# Altium PCB BYD_Leg_OneLeg.PcbDoc
Units mil, origin at the board's own origin, x right, y up, seen from the top; angles counter-clockwise.
Board outline 11500 x 6700 mil, 4 copper layers (Top Layer, Layer 1, Layer 2, Bottom Layer), stack 40.247 mil thick; 95 components, 38 nets, 384 pads, 147 vias.
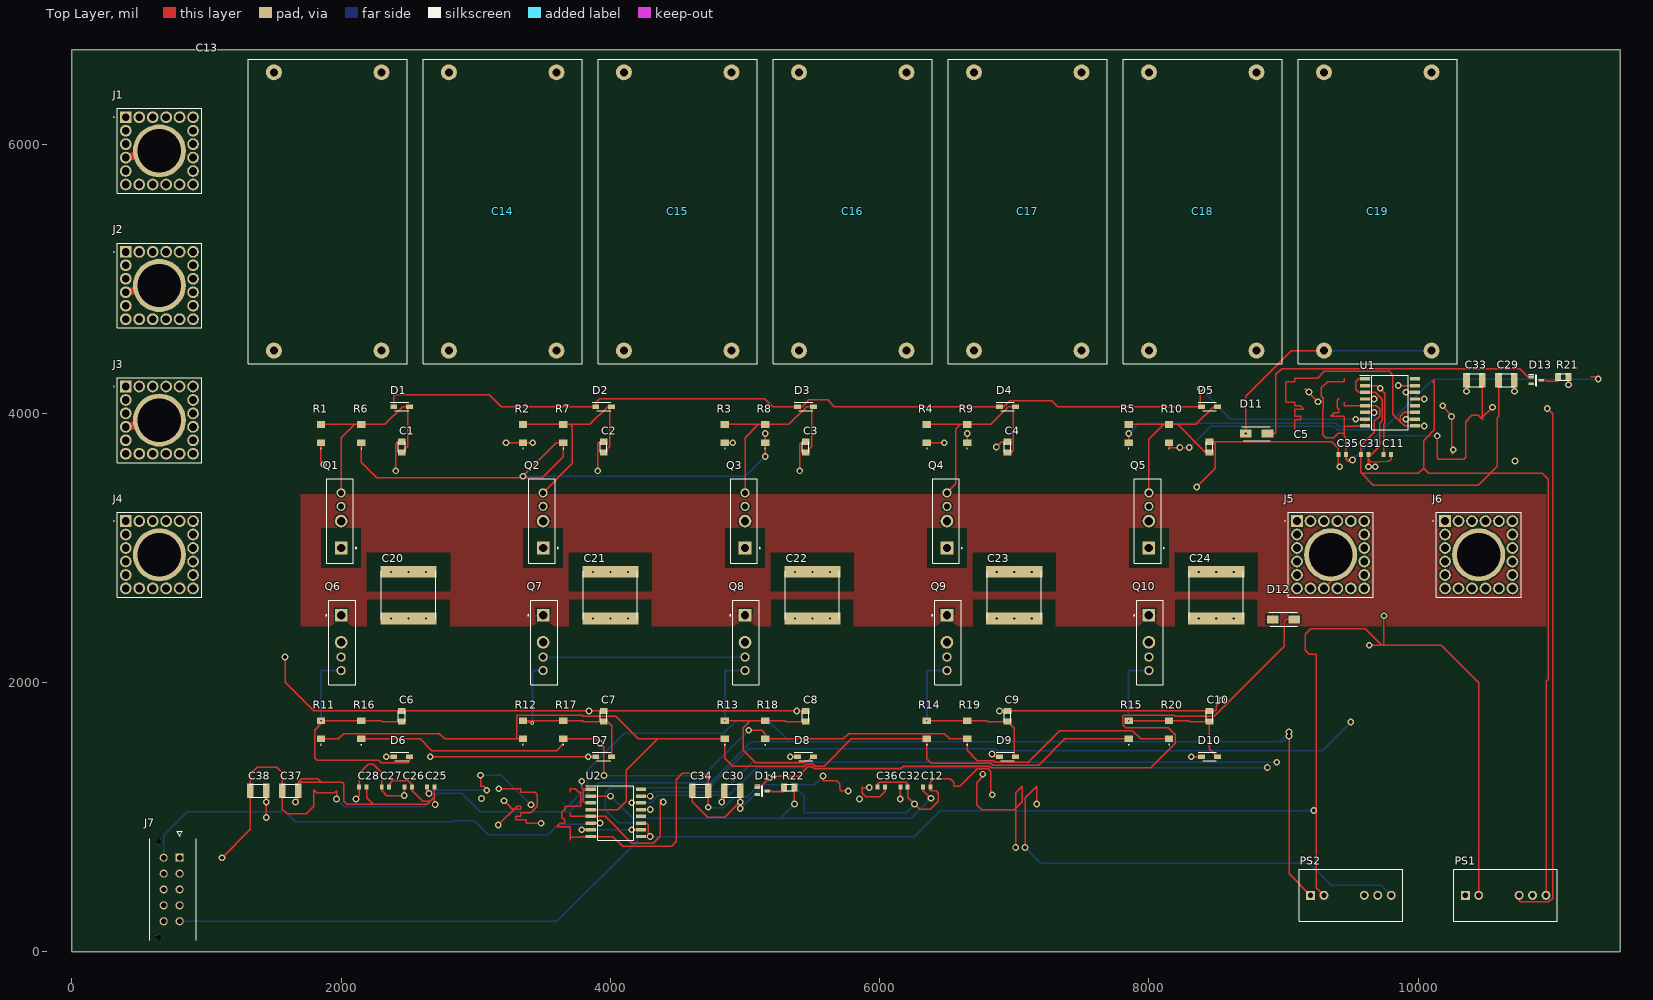
[diagram p0: Top Layer view]
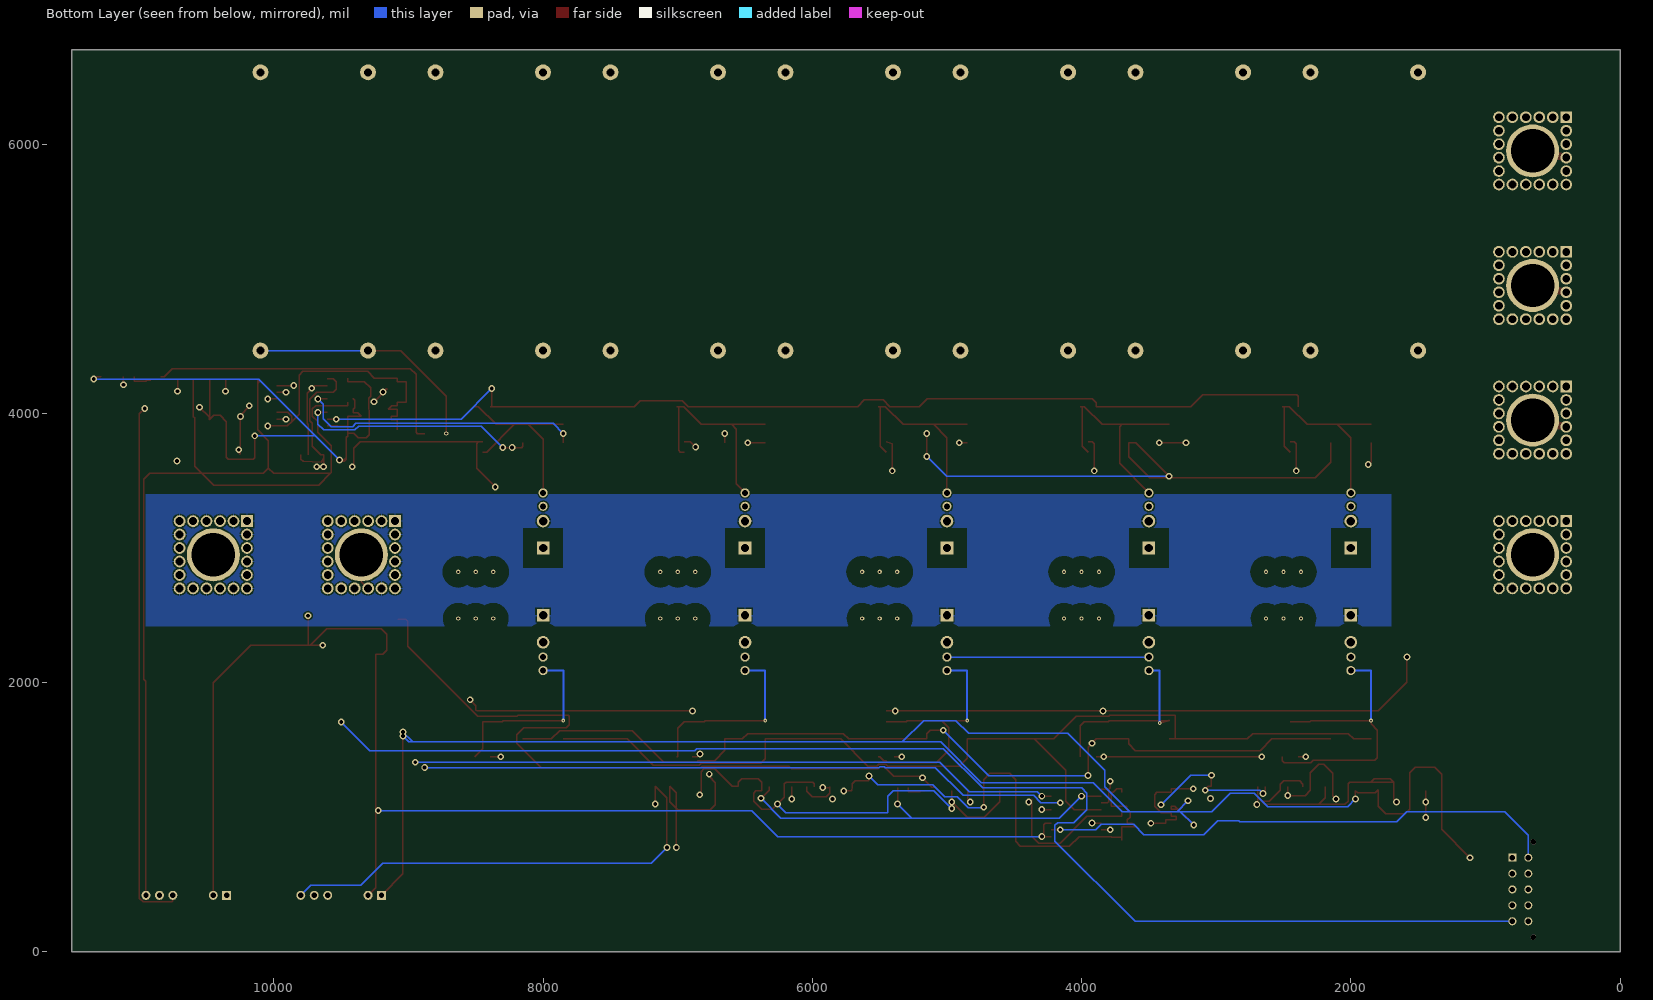
[diagram p1: Bottom Layer view, seen from below]
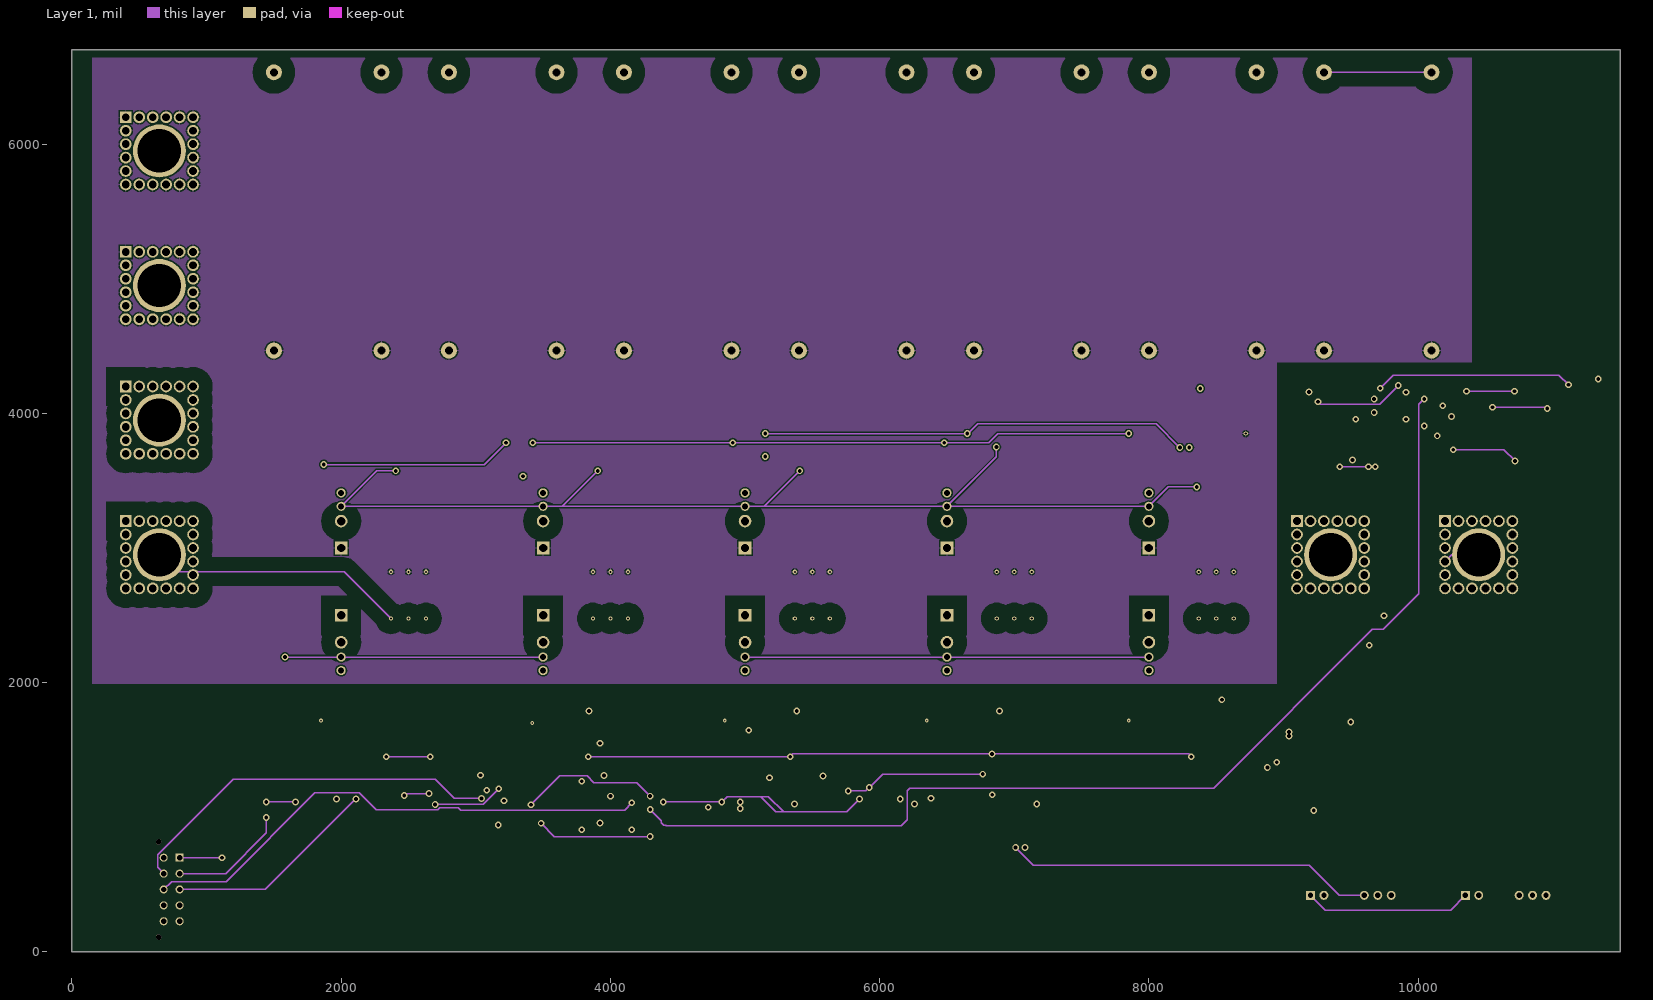
[diagram p2: Layer 1]
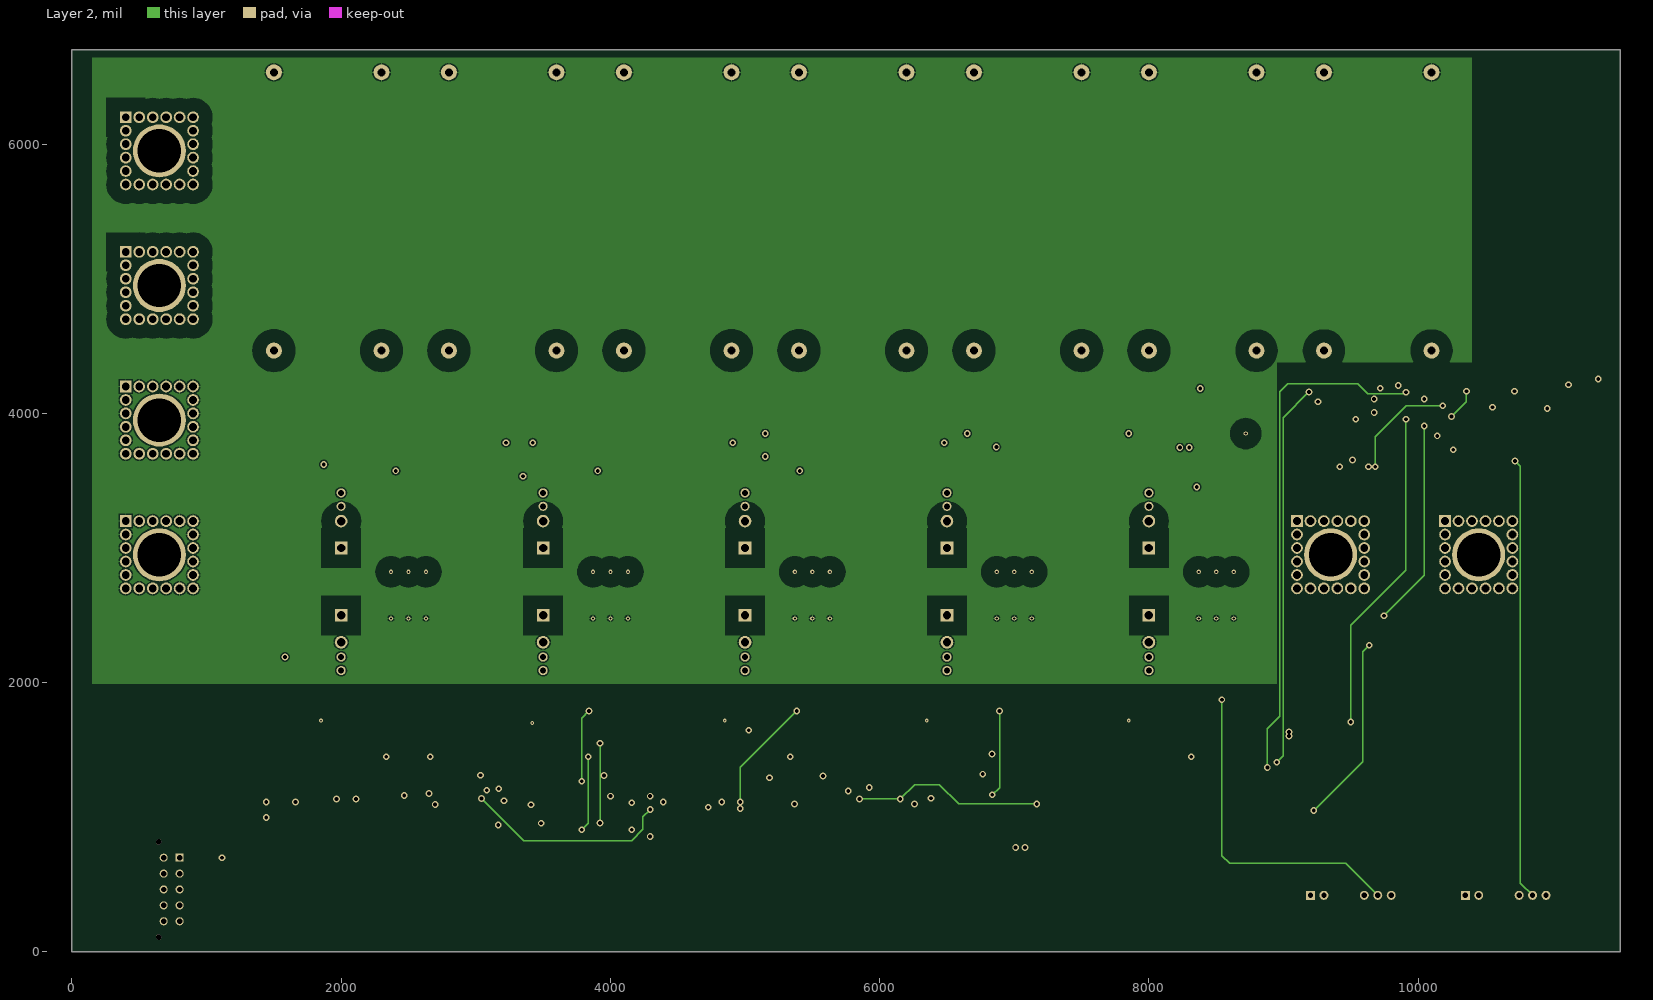
[diagram p3: Layer 2]
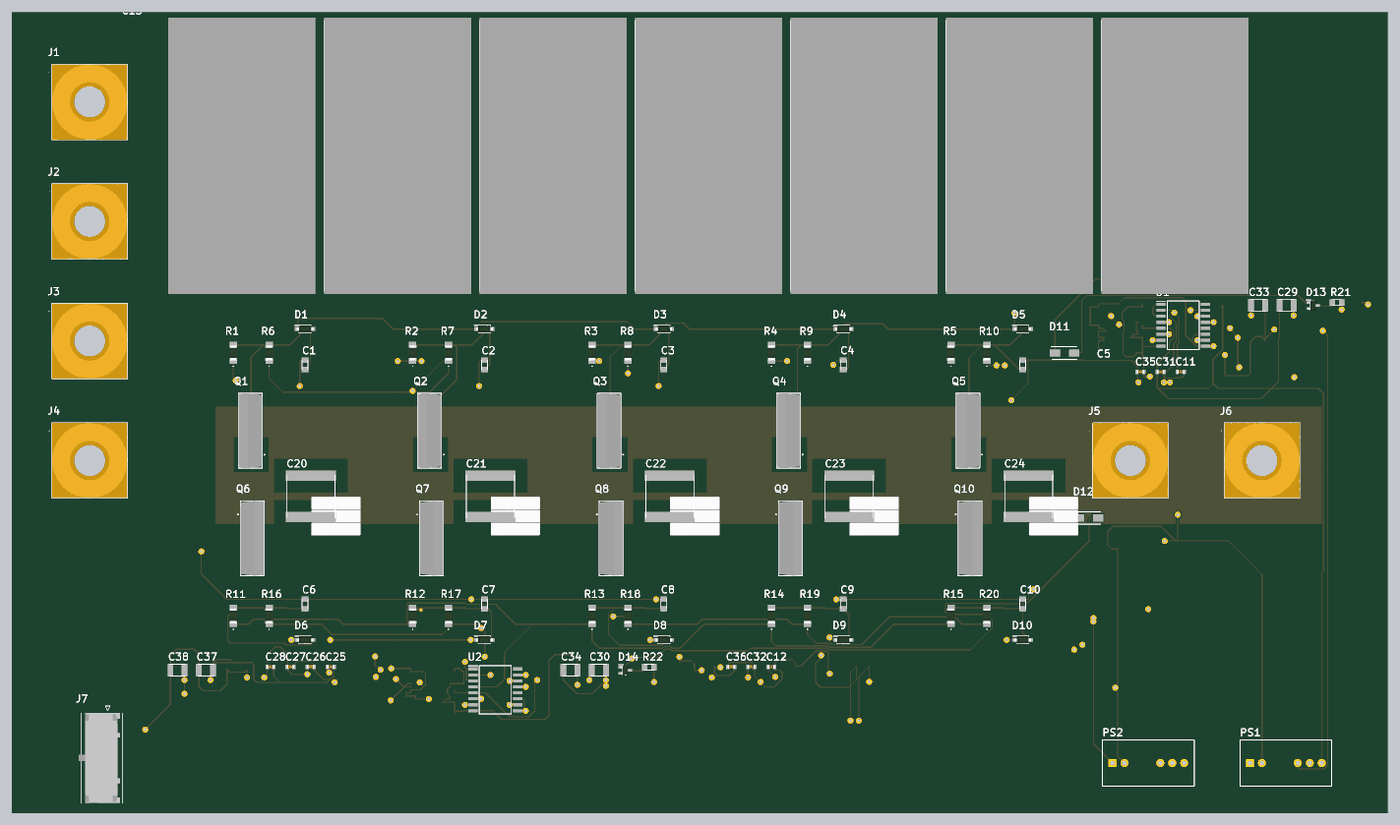
[diagram p4: 3D render of the assembled board from above, using the file's embedded part models]

## Layer stack, top to bottom
Top Solder: solder mask 0.4, Solder Resist, Dk 3.5
Top Layer: signal copper 5.5118
Dielectric 2: prepreg 2.8, PP-006, Dk 4.1
Layer 1: signal copper 5.5118
Dielectric 1: dielectric 12.6, FR-4, Dk 4.8
Layer 2: signal copper 5.5118
Dielectric 3: prepreg 2.8, PP-006, Dk 4.1
Bottom Layer: signal copper 5.5118
Bottom Solder: solder mask 0.4, Solder Resist, Dk 3.5

## Board outline
0,0 0,6700 11500,6700 11500,0

## Design rules (kind name [scope] priority, off if disabled: settings)
Clearance FinePitch_IC [InComponent('U3') or InComponent('U4') or InComponent('U5') vs InComponent('U3') or InComponent('U4') or InComponent('U5')] p1: gap=7 ignorepadtopadclearanceinfootprint=FALSE
Clearance HV_Clearance_1 [InNet('DCP') or InNet('DCN') or InNet('PH') vs InNet('DCP') or InNet('DCN') or InNet('PH')] p2: gap=100 ignorepadtopadclearanceinfootprint=FALSE // IPC-2221B B2/B4 spacing for 400 V bus, 525 V peak
Clearance HV_Clearance [InNet('DCP') or InNet('DCN') or InNet('PH') vs InNet('DCP') or InNet('DCN') or InNet('PH')] p3: gap=100 ignorepadtopadclearanceinfootprint=FALSE // IPC-2221B B2/B4 spacing for 400 V bus, 525 V peak
Clearance [All] p4: gap=10 ignorepadtopadclearanceinfootprint=FALSE
Height [All] p1: minheight=0 maxheight=10000 prefheight=500
PolygonConnect [All] p1: connectstyle=Relief reliefconductorwidth=10 reliefentries=4 polygonreliefangle="90 Angle" airgapwidth=10
RoutingVias [All] p1: holewidth=28 width=50 viastyle="Through Hole" minholewidth=28 minwidth=50 maxholewidth=28 maxwidth=50
SolderMaskExpansion [All] p1: expansion=0 istentingtop=FALSE
Width [All] p1: maxlimit=100 minlimit=10 preferedwidth=10
29 further rules are at their usual default settings.

## Components (designator, comment, footprint, x,y, rotation, side; value= is the part's Value field where it differs from the comment)
C1 "C0805C222J5GACAUTO" CAPC2012_0805 2450,3750 r90 top
C2 "C0805C222J5GACAUTO" CAPC2012_0805 3950,3750 r90 top
C3 "C0805C222J5GACAUTO" CAPC2012_0805 5450,3750 r90 top
C4 "C0805C222J5GACAUTO" CAPC2012_0805 6950,3750 r90 top
C5 "C0805C222J5GACAUTO" CAPC2012_0805 8450,3750 r90 top
C6 "C0805C222J5GACAUTO" CAPC2012_0805 2450,1750 r90 top
C7 "C0805C222J5GACAUTO" CAPC2012_0805 3950,1750 r90 top
C8 "C0805C222J5GACAUTO" CAPC2012_0805 5450,1750 r90 top
C9 "C0805C222J5GACAUTO" CAPC2012_0805 6950,1750 r90 top
C10 "C0805C222J5GACAUTO" CAPC2012_0805 8450,1750 r90 top
C11 "GCM1885C1H220JA16D" CAPC1608X90N 9771,3693 r0 top
C12 "GCM1885C1H220JA16D" CAPC1608X90N 6349,1225 r0 top
C13 "C4AKJBW5450A3MJ" C4AK_52P5 1900,5500 r90 top
C14 "C4AKJBW5450A3MJ" C4AK_52P5 3200,5500 r90 top
C15 "C4AKJBW5450A3MJ" C4AK_52P5 4500,5500 r90 top
C16 "C4AKJBW5450A3MJ" C4AK_52P5 5800,5500 r90 top
C17 "C4AKJBW5450A3MJ" C4AK_52P5 7100,5500 r90 top
C18 "C4AKJBW5450A3MJ" C4AK_52P5 8400,5500 r90 top
C19 "C4AKJBW5450A3MJ" C4AK_52P5 9700,5500 r90 top
C20 "CKC33C454KWGLC7805" KCLINK_3640 2500,2650 r270 top
C21 "CKC33C454KWGLC7805" KCLINK_3640 4000,2650 r270 top
C22 "CKC33C454KWGLC7805" KCLINK_3640 5500,2650 r270 top
C23 "CKC33C454KWGLC7805" KCLINK_3640 7000,2650 r270 top
C24 "CKC33C454KWGLC7805" KCLINK_3640 8500,2650 r270 top
C25 "1 uF" CAPC1608X90N 2665,1225 r0 top
C26 "1 uF" CAPC1608X90N 2497,1225 r0 top
C27 "100 nF" CAPC1608X90N 2329,1225 r0 top
C28 "100 nF" CAPC1608X90N 2161,1225 r0 top
C29 "10 uF" CAPC3225_1210 10656,4247 r0 top
C30 "10 uF" CAPC3225_1210 4906,1197 r0 top
C31 "100 nF" CAPC1608X90N 9603,3693 r0 top
C32 "100 nF" CAPC1608X90N 6181,1225 r0 top
C33 "10 uF" CAPC3225_1210 10418,4247 r0 top
C34 "10 uF" CAPC3225_1210 4668,1197 r0 top
C35 "100 nF" CAPC1608X90N 9435,3693 r0 top
C36 "100 nF" CAPC1608X90N 6013,1225 r0 top
C37 "10 uF" CAPC3225_1210 1622,1197 r0 top
C38 "10 uF" CAPC3225_1210 1384,1197 r0 top
D1 "PMEG4010CEH-Q" SOD3516X120N 2450,4050 r0 top
D2 "PMEG4010CEH-Q" SOD3516X120N 3950,4050 r0 top
D3 "PMEG4010CEH-Q" SOD3516X120N 5450,4050 r0 top
D4 "PMEG4010CEH-Q" SOD3516X120N 6950,4050 r0 top
D5 "PMEG4010CEH-Q" SOD3516X120N 8450,4050 r0 top
D6 "PMEG4010CEH-Q" SOD3516X120N 2450,1450 r0 top
D7 "PMEG4010CEH-Q" SOD3516X120N 3950,1450 r0 top
D8 "PMEG4010CEH-Q" SOD3516X120N 5450,1450 r0 top
D9 "PMEG4010CEH-Q" SOD3516X120N 6950,1450 r0 top
D10 "PMEG4010CEH-Q" SOD3516X120N 8450,1450 r0 top
D11 "US1MHE3" DIOM5127X229N 8800,3850 r0 top
D12 "US1MHE3" DIOM5127X229N 9000,2470 r0 top
D13 "BZX84W-C3V3" SOT65P210X110-3N 10878,4246 r0 top
D14 "BZX84W-C3V3" SOT65P210X110-3N 5128,1196 r0 top
J1 "7461090" 7461090 400,6200 r0 top
J2 "7461090" 7461090 400,5200 r0 top
J3 "7461090" 7461090 400,4200 r0 top
J4 "7461090" 7461090 400,3200 r0 top
J5 "7461090" 7461090 9100,3200 r0 top
J6 "7461090" 7461090 10200,3200 r0 top
J7 "43045-1012" 43045-10YY_121314 800,700 r90 top
PS1 "MGJ2D121805BSC" SIP7_MGJ2 10650,420 r0 top
PS2 "MGJ2D121805BSC" SIP7_MGJ2 9500,420 r0 top
Q1 "E4MS008075K1" E4M0060075K1 2000,3000 r90 top
Q2 "E4MS008075K1" E4M0060075K1 3500,3000 r90 top
Q3 "E4MS008075K1" E4M0060075K1 5000,3000 r90 top
Q4 "E4MS008075K1" E4M0060075K1 6500,3000 r90 top
Q5 "E4MS008075K1" E4M0060075K1 8000,3000 r90 top
Q6 "E4MS008075K1" E4M0060075K1 2000,2500 r270 top
Q7 "E4MS008075K1" E4M0060075K1 3500,2500 r270 top
Q8 "E4MS008075K1" E4M0060075K1 5000,2500 r270 top
Q9 "E4MS008075K1" E4M0060075K1 6500,2500 r270 top
Q10 "E4MS008075K1" E4M0060075K1 8000,2500 r270 top
R1 "ERJ-P08F10R0V" ERJP08_(1206) 1850,3850 r90 top
R2 "ERJ-P08F10R0V" ERJP08_(1206) 3350,3850 r90 top
R3 "ERJ-P08F10R0V" ERJP08_(1206) 4850,3850 r90 top
R4 "ERJ-P08F10R0V" ERJP08_(1206) 6350,3850 r90 top
R5 "ERJ-P08F10R0V" ERJP08_(1206) 7850,3850 r90 top
R6 "ERJ-P08F15R0V" ERJP08_(1206) 2150,3850 r90 top
R7 "ERJ-P08F15R0V" ERJP08_(1206) 3650,3850 r90 top
R8 "ERJ-P08F15R0V" ERJP08_(1206) 5150,3850 r90 top
R9 "ERJ-P08F15R0V" ERJP08_(1206) 6650,3850 r90 top
R10 "ERJ-P08F15R0V" ERJP08_(1206) 8150,3850 r90 top
R11 "ERJ-P08F10R0V" ERJP08_(1206) 1850,1650 r90 top
R12 "ERJ-P08F10R0V" ERJP08_(1206) 3350,1650 r90 top
R13 "ERJ-P08F10R0V" ERJP08_(1206) 4850,1650 r90 top
R14 "ERJ-P08F10R0V" ERJP08_(1206) 6350,1650 r90 top
R15 "ERJ-P08F10R0V" ERJP08_(1206) 7850,1650 r90 top
R16 "ERJ-P08F15R0V" ERJP08_(1206) 2150,1650 r90 top
R17 "ERJ-P08F15R0V" ERJP08_(1206) 3650,1650 r90 top
R18 "ERJ-P08F15R0V" ERJP08_(1206) 5150,1650 r90 top
R19 "ERJ-P08F15R0V" ERJP08_(1206) 6650,1650 r90 top
R20 "ERJ-P08F15R0V" ERJP08_(1206) 8150,1650 r90 top
R21 "1 kOhm" RESC2012_0805 11078,4271 r0 top
R22 "1 kOhm" RESC2012_0805 5328,1221 r0 top
U1 "UCC21750QDWRQ1" SOIC127P1030X265-16N 9791,4082 r0 top
U2 "UCC21750QDWRQ1" SOIC127P1030X265-16N 4041,1032 r0 top

## Footprints (in the part's own frame and the unit in brackets; to place one, negate y for a bottom-side part, rotate by r counter-clockwise, add the part's x,y. Pads: shape width x height; smd on the part's side, far side on the other; paste and mask are expansions set on the pad)
43045-10YY_121314 [mm]
  rect 1.52x1.52 hole 1.02: 1(0,0)
  round 1.52 hole 1.02: 2(-3,0) 3(-6,0) 4(-9,0) 5(-12,0) 6(0,3) 7(-3,3) 8(-6,3) 9(-9,3) 10(-12,3)
  round 1.02 hole 1.02 unplated: 11(3,3.94) 12(-15,3.94)
  silkscreen extent -15.57,-3.17 5,5.6, body extent -15.63,-2.59 3.52,6.18, height 9.75
7461090 [mm]
  rect 2.213x2.213 hole 1.475: 1(0,0)
  round 2.213 hole 1.475: 2(0,-2.54) 3(0,-5.08) 4(0,-7.62) 5(0,-10.16) 6(0,-12.7) 7(2.54,-12.7) 8(5.08,-12.7) 9(7.62,-12.7) 10(10.16,-12.7) 11(12.7,-12.7) 12(12.7,-10.16) 13(12.7,-7.62) 14(12.7,-5.08) 15(12.7,-2.54) 16(12.7,0) 17(10.16,0) 18(7.62,0) 19(5.08,0) 20(2.54,0)
  round 10 hole 8.2: 22(6.35,-6.35)
  silkscreen extent -2.3,-14.35 14.35,1.65, body extent -1.65,-14.35 14.35,1.65, height 13.5
C4AK_52P5 [mil] "KEMET C4AK box film capacitor, 4 leads 52.5 x 20.3 mm"
  round 118 hole 59: 1(-1033.5,-399.6) 1(-1033.5,399.6) 2(1033.5,-399.6) 2(1033.5,399.6)
  silkscreen extent -1132,-591 1132,591, body extent -1156,-637 1156,592, height 1819
CAPC1608X90N [mm]
  rect 0.75x0.94 smd: 1(-0.7,0) 2(0.7,0)
  body extent -0.8,-0.4 0.8,0.4, height 0.9
CAPC2012_0805 [mil] "Chip capacitor 0805"
  rect 45.3x57.1 smd: 1(-39.4,0) 2(39.4,0)
  silkscreen extent -39,-25 39,25
CAPC3225_1210 [mil] "Chip capacitor 1210"
  rect 49.2x106.3 smd: 1(-59.1,0) 2(59.1,0)
  silkscreen extent -63,-49 63,49
DIOM5127X229N [mm]
  rect 2.2x1.55 smd: 1(-2.05,0) 2(2.05,0)
  silkscreen extent -2.82,-1.33 2.55,1.33, body extent -0.23,4.13 -0.23,4.13, height 3.6
E4M0060075K1 [mm]
  rect 2.383x2.383 hole 1.589: 1(0,0)
  round 2.383 hole 1.589: 2(5.08,0)
  round 1.725 hole 1.15: 3(7.87,0) 4(10.41,0)
  silkscreen extent -2.89,-2.9 13.05,2.73, body extent -2.89,-2.3 13.05,2.72, height 25.86
ERJP08_(1206) [mm]
  rect 1.25x1.55 smd: 1(-1.725,0) 2(1.725,0)
  silkscreen extent -2.87,-0.05 -2.78,0.05, body extent -1.6,-0.8 1.6,0.8, height 0.6
KCLINK_3640 [mil] "KEMET KC-LINK 3640 stacked C0G"
  rect 86.6x417.3 smd: 1(-173.2,0) 2(173.2,0)
  silkscreen extent -179,-201 179,201, body extent 0,0 327,417
RESC2012_0805 [mil] "Chip 0805 (2012 metric)"
  rect 45.3x57.1 smd: 1(-39.4,0) 2(39.4,0)
  silkscreen extent -39,-25 39,25
SIP7_MGJ2 [mil] "Murata MGJ2 SIP-7 (pins 1,2,5,6,7; 2.54 mm pitch)"
  rect 67x67 hole 39.4: 1(-300,0)
  round 67 hole 39.4: 2(-200,0) 5(100,0) 6(200,0) 7(300,0)
  silkscreen extent -384,-193 384,193
SOD3516X120N [mm]
  rect 1.3x0.8 smd: 1(-1.5,0) 2(1.5,0)
  silkscreen extent -2.15,-0.8 1.3,0.8, body extent -1.75,-0.8 1.75,0.8, height 1.1
SOIC127P1030X265-16N [mm]
  rect 1.95x0.65 smd: 1(-4.725,4.445) 2(-4.725,3.175) 3(-4.725,1.905) 4(-4.725,0.635) 5(-4.725,-0.635) 6(-4.725,-1.905) 7(-4.725,-3.175) 8(-4.725,-4.445) 9(4.725,-4.445) 10(4.725,-3.175) 11(4.725,-1.905) 12(4.725,-0.635) 13(4.725,0.635) 14(4.725,1.905) 15(4.725,3.175) 16(4.725,4.445)
  silkscreen extent -5.7,-5.15 3.4,5.15, body extent 0,0 0,0
SOT65P210X110-3N [mm]
  rect 1x0.55 smd: 1(-0.95,0.65) 2(-0.95,-0.65) 3(0.95,0)
  silkscreen extent -1.45,-1 0.1,1.18, body extent -1.05,-1.05 1.05,1.05, height 0.95

## Part data
C1 C2 C3 C4 C5 C6 C7 C8 C9 C10: library part CAP_NP, "2.2 nF 50 V C0G 0805 (external Cgs)"
C11 C12: "22 pF 50 V C0G 0603 DESAT blanking", Manufacturer_Name="Murata Electronics", Mouser Part Number=81-GCM1885C1H220J16D, Arrow Part Number=GCM1885C1H220JA16D, Arrow Price/Stock=https://www.arrow.com/en/products/gcm1885c1h220ja16d/murata-manufacturing?utm_currency=USD&region=europe, Datasheet Link=https://search.murata.co.jp/Ceramy/image/img/A01X/G101/ENG/GCM1885C1H220JA16-01A.pdf, Height=0.9mm, Manufacturer_Part_Number=GCM1885C1H220JA16D, Mouser Price/Stock=https://www.mouser.com/Search/Refine.aspx?Keyword=81-GCM1885C1H220J16D
C13 C14 C15 C16 C17 C18 C19: library part CAP_NP, "45 uF 700 V DC-link film (KEMET C4AK)"
C20 C21 C22 C23 C24: library part CAP_NP, "450 nF 650 V C0G KC-LINK, one per device pair"
C25 C26: library part CAP_NP, "1 uF 16 V X7R 0603, driver VCC"
C27 C28: library part CAP_NP, "100 nF 50 V X7R 0603, driver VCC"
C29 C30: library part CAP_NP, "10 uF 50 V X7R 1210, driver VDD-COM"
C31 C32: library part CAP_NP, "100 nF 50 V X7R 0603, driver VDD-COM"
C33 C34: library part CAP_NP, "10 uF 50 V X7R 1210, driver COM-VEE"
C35 C36: library part CAP_NP, "100 nF 50 V X7R 0603, driver COM-VEE"
C37 C38: library part CAP_NP, "10 uF 50 V X7R 1210, bias VIN"
D1 D2 D3 D4 D5 D6 D7 D8 D9 D10: library part PMEG4010CEH, "40 V 1 A Schottky gate clamp", Manufacturer_Name=Nexperia, Mouser Part Number=N/A, Datasheet Link=https://datasheet.datasheetarchive.com/originals/distributors/SFDatasheet-4/sf-00082344.pdf, Height=1.2mm, Manufacturer_Part_Number=PMEG4010CEH, Mouser Price/Stock=https://www.mouser.co.uk/ProductDetail/Nexperia/PMEG4010CEH?qs=vHuUswq2%252BszYBzs3vH3ikw%3D%3D
D11 D12: library part US1MHE3_61T, "1000 V 1 A ultrafast DESAT diode", Manufacturer_Name=Vishay, Manufacturer_Part_Number=US1MHE3/61T, Mouser Part Number=625-US1MHE3, Datasheet Link=https://www.vishay.com/docs/88768/us1_test_dcicons.pdf, Height=2.29mm, Mouser Price/Stock=https://www.mouser.co.uk/ProductDetail/Vishay-Semiconductors/US1MHE3-61T?qs=D6r9GjgEnNNyhtP47Emw%252Bg%3D%3D
D13 D14: library part BZX84W-C3V3F, "3.3 V Zener, DESAT threshold offset", Manufacturer_Name=Nexperia, Mouser Part Number=771-BZX84W-C3V3F, Arrow Part Number=BZX84W-C3V3F, Arrow Price/Stock=https://www.arrow.com/en/products/bzx84w-c3v3f/nexperia.html?utm_currency=USD&region=europe, Datasheet Link=https://assets.nexperia.com/documents/data-sheet/BZX84W_SER.pdf, Height=1.1mm, Manufacturer_Part_Number=BZX84W-C3V3F, Mouser Price/Stock=https://www.mouser.co.uk/ProductDetail/Nexperia/BZX84W-C3V3F?qs=MLItCLRbWsyTlmZP9y0kXg%3D%3D
J1 J2 J3 J4 J5 J6: "REDCUBE M8 press-fit power terminal 350 A", Manufacturer_Name="Wurth Elektronik", Mouser Part Number=710-7461090, Datasheet Link=https://www.we-online.com/catalog/datasheet/7461090.pdf, Height=13.5mm, Manufacturer_Part_Number=7461090, Mouser Price/Stock=https://www.mouser.co.uk/ProductDetail/Wurth-Elektronik/7461090?qs=lykWx4dhCCGdDXRKZo1kEg%3D%3D
J7: "Control connector 2x5 Micro-Fit 3.0", Manufacturer_Name=Molex, Mouser Part Number=538-43045-1012, Datasheet Link=https://www.molex.com/pdm_docs/sd/430450612_sd.pdf, Height=9.91mm, Manufacturer_Part_Number=43045-1012, Mouser Price/Stock=https://www.mouser.co.uk/ProductDetail/Molex/43045-1012?qs=KC2ywxza1koTZPAgAiHw3w%3D%3D
PS1 PS2: "Isolated DC/DC 12 V to +18 V / -5 V, 2 W, 5.4 kV (Murata MGJ2B)"
Q1 Q2 Q3 Q4 Q5 Q6 Q7 Q8 Q9 Q10: library part E4M0015075K1, "SiC MOSFET 750 V 8 mOhm TO-247-4 (Wolfspeed)", Manufacturer_Name=Wolfspeed, Mouser Part Number=941-E4M0015075K1, Arrow Part Number=E4M0015075K1, Arrow Price/Stock=https://www.arrow.com/en/products/e4m0015075k1/wolfspeed.html?utm_currency=USD&region=nac, Datasheet Link=https://assets.wolfspeed.com/uploads/2024/04/Wolfspeed_E4M0015075K1_data_sheet.pdf, Height=21.14mm, Manufacturer_Part_Number=E4M0015075K1, Mouser Price/Stock=https://www.mouser.co.uk/ProductDetail/Wolfspeed/E4M0015075K1?qs=dbcCsuKDzFXJMp4AtpeCVw%3D%3D
R1 R2 R3 R4 R5 R11 R12 R13 R14 R15: "10 Ohm 1% 1206 0.66 W anti-surge (RG,on)", Manufacturer_Name=Panasonic, Mouser Part Number=667-ERJ-P08F10R0V, Arrow Part Number=ERJ-P08F10R0V, Arrow Price/Stock=https://www.arrow.com/en/products/erj-p08f10r0v/panasonic?region=nac, Datasheet Link=http://industrial.panasonic.com/cdbs/www-data/pdf/RDO0000/AOA0000C331.pdf, Height=0.7mm, Manufacturer_Part_Number=ERJ-P08F10R0V, Mouser Price/Stock=https://www.mouser.co.uk/ProductDetail/Panasonic/ERJ-P08F10R0V?qs=iIVTEDlrHA2fc4Vdv4Btrw%3D%3D
R6 R7 R8 R9 R10 R16 R17 R18 R19 R20: "15 Ohm 1% 1206 0.66 W anti-surge (RG,off)", Manufacturer_Name=Panasonic, Mouser Part Number=667-ERJ-P08F15R0V, Arrow Part Number=ERJ-P08F15R0V, Arrow Price/Stock=https://www.arrow.com/en/products/erjp08f15r0v/panasonic?utm_currency=USD&region=nac, Datasheet Link=http://industrial.panasonic.com/cdbs/www-data/pdf/RDO0000/AOA0000C331.pdf, Height=0.7mm, Manufacturer_Part_Number=ERJ-P08F15R0V, Mouser Price/Stock=https://www.mouser.co.uk/ProductDetail/Panasonic/ERJ-P08F15R0V?qs=iIVTEDlrHA16GO8SZGWd2Q%3D%3D
R21 R22: library part RES, "1 kOhm 1% 0805 DESAT series resistor"
U1 U2: "Isolated SiC gate driver, 10 A, DESAT, Miller clamp", Manufacturer_Name="Texas Instruments", Mouser Part Number=595-UCC21750QDWRQ1, Arrow Part Number=UCC21750QDWRQ1, Arrow Price/Stock=https://www.arrow.com/en/products/ucc21750qdwrq1/texas-instruments.html?utm_currency=USD&region=nac, Datasheet Link=https://www.ti.com/lit/gpn/UCC21750-Q1, Height=2.65mm, Manufacturer_Part_Number=UCC21750QDWRQ1, Mouser Price/Stock=https://www.mouser.co.uk/ProductDetail/Texas-Instruments/UCC21750QDWRQ1?qs=BJlw7L4Cy7%2FADnnEzoLd5w%3D%3D

## Via types
v1: diameter 50, hole 28, Top Layer to Bottom Layer, 111 vias
v2: diameter 32, hole 16, Top Layer to Bottom Layer, 31 vias
v3: diameter 28, hole 12, Top Layer to Bottom Layer, 5 vias

## Nets (pads, with @x,y where several pads share a name; then routed paths per layer and width w, separated by ;. In a path a pad name is that pad's centre, name@x,y a point inside that pad or via, vN(x,y) a via of type N, cw(c..) or ccw(c..) an arc to the next point about the centre after c; other vN are vias at no path point)
+5V: C25.1 C26.1 C27.1 C28.1 J7.3 U1.15 U2.15 | length 13440.3
  Top Layer w10: v1(2109.41,1136) 2133.44,1160.03 C28.1 2133.44,1325.44 2200,1392 2240,1392 2301.44,1330.56 C27.1 2301.44,1200 2340.22,1161.22 2468.32,1161.22 2468.34,1162.36 C26.1 v1(2469.44,1162.34) ; C25.1 2637.44,1190.34 v1(2652,1175.78) ; v1(3035.5,1312) 3035.5,1230 3060,1230 3082,1208 v1(3082,1200) ; v1(3409.35,1093.6) v1@3409.35,1113.6 ; U2.15 v1(4295,1157) ; v1(9189,4159) 9163.3,4184.7 9158.3,4184.7 v1(9256,4087) ; v1(9853,4207) U1.15
  Layer 1 w10: J7.3 1437.19,463.78 v1(2109.41,1136) ; v1(2469.44,1162.34) 2482.88,1175.78 v1(2652,1175.78) ; v1(3409.35,1093.6) 3622.75,1307 3826.59,1307 3876.59,1257 4195,1257 v1(4295,1157) ; v1(9256,4087) 9276,4067 9713,4067 v1(9853,4207)
  Layer 2 w10: v1(8949,1409) 8998,1458 8998,3968 v1(9189,4159)
  Bottom Layer w10: v1(2652,1175.78) 2676.22,1200 v1(3082,1200) ; v1(3035.5,1312) 3190.95,1312 v1(3409.35,1093.6) ; v1(4295,1157) 4328,1190 4833,1190 5052,1409 v1(8949,1409)
+12V: C37.1 C38.1 J7.1 PS1.1 PS2.1 | length 19068.3
  Top Layer w10: v1(1114.9,700) 1324.9,910 C38.1 1324.9,1320 1376.9,1372 1520,1372 1562.9,1329.1 C37.1 1562.9,1060 1597.9,1025 1742.44,1025 1797.44,1080 1797.44,1204 1820,1181.44 1950,1181.44 1965.44,1196.88 v1(1965.44,1136) ; v1(3167,943) 3307.6,1083.6 3334,1083.6 ; v1(3210,1122) 3274,1058 3334,1058 ; 3334.9,1058 3334,1058 ; 3334.9,1083.6 3334,1083.6 ; v1(9041,1633) v1(9041,1603) 9041,579 PS2.1 ; 3334,1058 3334,1083.6
  Layer 1 w10: J7.1 v1(1114.9,700) ; PS2.1 9309,311 10241,311 PS1.1
  Layer 2 w10: v1(9041,1603) v1(9041,1633)
  Bottom Layer w10: v1(1965.44,1136) 2023.44,1078 2616,1078 2718,1180 2894,1180 3032,1042 3290,1042 ; v1(3167,943) 3266,1042 3290,1042 ; v1(3210,1122) 3290,1042 ; v1(9041,1603) 8998,1560 8968,1560 ; v1(9041,1633) 8968,1560 ; 3290,1042 3697,1042 3912,1257 4745,1257 5048,1560 8968,1560 ; 3290,1042 3642,1042 3827,1227 3827,1350 4102,1625 4840,1625 4933,1718 5174,1718 5332,1560 8968,1560
CLMPI_H: D1.1 D2.1 D3.1 D4.1 D5.1 U1.7 | length 7722.2
  Top Layer w10: D1.1 2390,4050 2390,4129 2400,4139 3099,4139 3188,4050 D2.1@3890,4050 ; D2.1 D2.1@3890,4050 ; v1(8381,4185) D5.1@8381,4050 ; D5.1 D5.1@8381,4050 ; v1(9537,3957) U1.7 ; D2.1@3890,4050 3890,4080 3920,4110 5147,4110 5207,4050 D3.1 5424,4050 5474,4100 5614,4100 5664,4050 D4.1 6920,4050 6965,4095 7279,4095 7324,4050 D5.1@8381,4050
  Bottom Layer w10: v1(8381,4185) 8609,3957 v1(9537,3957)
CLMPI_L: D6.1 D7.1 D8.1 D9.1 D10.1 U2.7 | length 6934.5
  Top Layer w10: v1(2335,1450) D6.1 ; v1(2661,1450) v1(3835.35,1450) D7.1 ; v1(3787,907) U2.7 ; v1(5335.35,1450) D8.1 ; v1(6835.35,1470) 6855.35,1450 D9.1 ; v1(8315,1450) D10.1
  Layer 1 w10: v1(2335,1450) v1(2661,1450) ; v1(3835.35,1450) v1(5335.35,1450) 5355.35,1470 v1(6835.35,1470) 8295,1470 v1(8315,1450)
  Layer 2 w10: v1(3787,907) 3835.35,955.35 v1(3835.35,1450)
DCN: C13.2 C14.2 C15.2 C16.2 C17.2 C18.2 C19.2 C20.2 C21.2 C22.2 C23.2 C24.2 J3.1 J3.2 J3.3 J3.4 J3.5 J3.6 J3.7 J3.8 J3.9 J3.10 J3.11 J3.12 J3.13 J3.14 J3.15 J3.16 J3.17 J3.18 J3.19 J3.20 J3.22 J4.1 J4.2 J4.3 J4.4 J4.5 J4.6 J4.7 J4.8 J4.9 J4.10 J4.11 J4.12 J4.13 J4.14 J4.15 J4.16 J4.17 J4.18 J4.19 J4.20 J4.22 Q6.2 Q7.2 Q8.2 Q9.2 Q10.2 | length 3043.7
  Top Layer w60: J3.4 J3.22
  Layer 1 w10: J4.22 650,2825 2022,2825 v2(2370,2477) ; C19.2@9300.4,6533.5 9300.9,6533 10099.1,6533 C19.2@10099.6,6533.5
  other v2: 2500,2477 2630,2477 3870,2477 4000,2477 4130,2477 5370,2477 5500,2477 5630,2477 6870,2477 7000,2477 7130,2477 8370,2477 8500,2477 8630,2477
DCP: C13.1 C14.1 C15.1 C16.1 C17.1 C18.1 C19.1 C20.1 C21.1 C22.1 C23.1 C24.1 D11.1 J1.1 J1.2 J1.3 J1.4 J1.5 J1.6 J1.7 J1.8 J1.9 J1.10 J1.11 J1.12 J1.13 J1.14 J1.15 J1.16 J1.17 J1.18 J1.19 J1.20 J1.22 J2.1 J2.2 J2.3 J2.4 J2.5 J2.6 J2.7 J2.8 J2.9 J2.10 J2.11 J2.12 J2.13 J2.14 J2.15 J2.16 J2.17 J2.18 J2.19 J2.20 J2.22 Q1.1 Q2.1 Q3.1 Q4.1 Q5.1 | length 2308.4
  Top Layer w10: D11.1 v2(8719,3850) 8719,4127 9058.5,4466.5 C19.1@9300.4,4466.5
  Top Layer w60: J2.4 J2.22 ; J1.4 J1.22
  Bottom Layer w10: C19.1@9300.4,4466.5 C19.1@10099.6,4466.5
  other v2: 2370,2823 2500,2823 2630,2823 3870,2823 4000,2823 4130,2823 5370,2823 5500,2823 5630,2823 6870,2823 7000,2823 7130,2823 8370,2823 8500,2823 8630,2823
DESAT_H: C11.1 R21.2 U1.2 | length 2190.3
  Top Layer w10: U1.2 9696.44,4207 ; v1(9718,4187) 9698,4207 9696.44,4207 ; C11.1 9743.44,3917.44 9753,3927 9753,4150.44 9696.44,4207 ; v1(11117,4212.4) 11117.4,4212.8 R21.2
  Layer 1 w10: v1(9718,4187) 9815,4284 11045.4,4284 v1(11117,4212.4)
DESAT_L: C12.1 R22.2 U2.2 | length 3033.2
  Top Layer w10: U2.2 v1(4001,1157) ; v1(5367.4,1097.85) R22.2 ; C12.1 6321.44,1200 v1(6380.72,1140.72)
  Bottom Layer w10: v1(4001,1157) 4164.15,993.85 5263.4,993.85 ; v1(5367.4,1097.85) 5263.4,993.85 ; v1(6380.72,1140.72) 6233.85,993.85 5263.4,993.85
DSA_H: D11.2 D13.1 | length 2435.9
  Top Layer w10: D11.2 8933,3850 8943,3860 8943,4289 8986,4332 10753,4332 10813.41,4271.59 D13.1
DSA_L: D12.2 D14.1 | length 5489.4
  Top Layer w10: D14.1 5114.01,1221.59 5181,1288.58 v1(5181,1294) ; v1@5188.69,1303.97 5189.83,1302.84 5191.01,1301.65 5199.47,1301.65 5201.79,1303.97 5393.84,1303.97 5464.87,1375 5498.01,1375 5513.01,1360 6153.23,1360 6173.65,1380.41 6817.72,1380.41 6830.13,1368 8012.25,1368 8195.51,1551.27 8195.51,1612.91 8144.42,1664 7827.58,1664 7804.49,1687.09 7804.49,1748.73 7813.28,1757.52 8186.73,1757.52 8192.5,1751.75 8484.76,1751.75 9005,2271.99 9005,2455 9020,2470 D12.2
DSZ_H: D13.3 R21.1 | length 156.7
  Top Layer w10: D13.3 10945,4246 10951,4240 11038.6,4240 R21.1
DSZ_L: D14.3 R22.1 | length 155.3
  Top Layer w10: D14.3 5195,1196 5200,1191 5288.6,1191 R22.1
FLT_N: J7.7 U1.13 U2.13 | length 12595
  Top Layer w10: U2.13 v1(4295.41,1057) ; U1.13 v1(10045,4107)
  Layer 1 w10: J7.7 636,627.78 636,720 1199,1283 2698,1283 2841.41,1139.59 v1(3042,1139.59) ; v1(4295.41,1057) 4377.24,975.17 4377.24,960 4397.7,939.54 4412.87,939.54 4415.41,937 6160,937 6204,981 6204,1196 6224,1216 8480,1216 9659.51,2395.51 9738.99,2395.51 10005,2661.53 10005,4067 v1(10045,4107)
  Layer 2 w10: v1(3042,1139.59) 3354.59,827 4158,827 4241,910 4241,1002.59 v1(4295.41,1057)
GND: C25.2 C26.2 C27.2 C28.2 C37.2 C38.2 J7.2 PS1.2 PS2.2 U1.9 U1.11 U2.9 U2.11 | length 21517
  Top Layer w10: v1(1443,1114) v1@1443.1,1114.1 ; v1(1443.1,999) v1@1443.1,1114.1 ; C38.2 v1@1443.1,1114.1 ; v1(1660.15,1114) 1681.1,1134.95 C37.2 1681.1,1260 ; C28.2 2188.56,1146.44 2240,1095 ; C27.2 2356.56,1246.56 2380,1270 2500,1270 2524.56,1245.44 C26.2 2524.56,1202 2606.56,1120 2663,1120 ; C25.2 2692.56,1149.56 ; v1(2698,1095) 2692.56,1100.44 2692.56,1149.56 ; v1(3171.05,1211.5) 3334,1211.5 ; 3334.9,1211.5 3334,1211.5 ; v1(3485.4,955.6) 3403.4,955.6 3373.2,955.6 3373.2,981.2 3296.8,981.2 3296.8,1006.8 3334.9,1006.8 3334.9,1032.4 3409.4,1032.4 3457,1080 3457,1168.9 3440,1185.9 3334,1185.9 3334,1211.5 ; U2.9 v1@4270,857 ; U2.11 4270,957 4281,946 4281,868 v1@4270,857 ; v1(4295,857) v1@4270,857 ; 9084.9,3877.7 9084,3877.7 9084,3903.3 ; 9084.9,3903.3 9084,3903.3 ; 9084.9,4005.6 9084,4005.6 ; 9084.9,4235.9 9084,4235.9 ; PS2.2 9243.23,476.77 9243.23,2211.61 9190.39,2211.61 9162,2240 9162,2360 9202,2400 9608.56,2400 9731,2277.56 ; v1(9636.79,2277.56) 9731,2277.56 ; v1(9746,2497) 9746,2277.56 ; U1.11 9895,4007 9868,3980 9868,3939 ; v1(10045,3907) U1.9 9900,3907 9868,3939 ; PS1.2 10450,1998 10170.44,2277.56 9900,2277.56 9746,2277.56 ; 1681.1,1260 1852.56,1260 ; 1681.1,1260 1706.1,1285 1827.56,1285 1852.56,1260 ; 1852.56,1260 2008.56,1260 2020.56,1248 2020.56,1120 2045.56,1095 2240,1095 ; 2240,1095 2638,1095 2663,1120 ; 2663,1120 2692.56,1149.56 ; 9084,3903.3 9084,3928.8 9084.9,3928.8 9084.9,3954.4 9127.8,3954.4 9127.8,3980 9084,3980 9084,4005.6 ; 9084,4005.6 9084,4031.2 9149,4031.2 9123.4,4056.8 9084.9,4056.8 9084.9,4082.4 9045,4082.4 9035,4082.4 9015,4082.4 9015,4160 9015,4235.9 9035,4235.9 9045,4235.9 9084,4235.9 ; 9084,4235.9 9084,4261.5 9253,4261.5 9303,4311.5 9784.5,4311.5 9813,4283 9813,3994 9868,3939 ; 9731,2277.56 9746,2277.56
  Layer 1 w10: J7.2 1140.89,581.89 1443.1,884.1 v1(1443.1,999) ; v1(1443,1114) v1(1660.15,1114) ; v1(2698,1095) 3054.55,1095 v1(3171.05,1211.5) ; v1(3485.4,955.6) 3584,857 v1(4295,857)
  Layer 2 w10: v1(9224,1050) 9587,1413 9587,2227.77 v1(9636.79,2277.56) ; v1(9746,2497) 10045,2796 v1(10045,3907)
  Bottom Layer w10: v1(4295,857) 6257.06,857 6450.06,1050 v1(9224,1050)
KS_H: C1.2 C2.2 C3.2 C4.2 C5.2 C11.2 C29.2 C31.2 C33.1 C35.1 PS1.6 Q1.3 Q2.3 Q3.3 Q4.3 Q5.3 U1.1 U1.3 | length 17948.5
  Top Layer w10: v1(2406,3573) 2406,3775.4 2420,3789.4 C1.2 ; v1(3906,3573) 3906,3775.4 3920,3789.4 C2.2 ; v1(5406,3573) 5406,3775.4 C3.2 ; v1(6867,3750.4) 6906,3789.4 C4.2 ; v1(8355,3454) 8494,3593 8494,3775.4 8480,3789.4 ; C5.2 8480,3789.4 ; v1(9418,3604) 9407.44,3614.56 C35.1 9407.44,3741.56 9360,3789 8958,3789 8957.6,3789.4 8480,3789.4 ; U1.1 9560,4257 9537,4234 9537,4180 9560,4157 U1.3 9680,4157 9733,4104 9733,3947 9714,3928 9714,3757 9650,3693 C31.2 9630.56,3666.44 ; v1(9630.56,3604) 9630.56,3666.44 ; C11.2 9798.56,3660 9782.56,3644 9647,3638 9630.56,3666.44 ; v1(10183,4057) v1(10248.5,3977) 10248.5,3698 10260,3709.5 v1(10260,3730) ; v1(10358.9,4164.1) C33.1 ; v1(10715.1,4164.1) C29.2
  Layer 1 w10: v1(2406,3573) 2263.16,3573 Q1.3 Q2.3 3642.84,3309.84 ; v1(3906,3573) 3642.84,3309.84 ; v1(5406,3573) 5143,3310 ; v1(6867,3750.4) 6867,3676.84 Q4.3 ; v1(8355,3454) 8144.16,3454 Q5.3 Q4.3 ; v1(9418,3604) v1(9630.56,3604) v1(9681,3604) ; v1(10260,3730) 10637,3730 v1(10720,3647) ; v1(10358.9,4164.1) v1(10715.1,4164.1) ; 3642.84,3309.84 Q3.3 ; Q3.3 5142.84,3309.84 5143,3310 ; Q3.3 5143,3310 ; 5143,3310 6499.84,3310 Q4.3
  Layer 2 w10: v1(9681,3604) 9681,3826 9912,4057 v1(10183,4057) ; v1(10248.5,3977) 10358.9,4087.4 v1(10358.9,4164.1) ; v1(10720,3647) 10759,3608 10759,511 PS1.6
KS_L: C6.2 C7.2 C8.2 C9.2 C10.2 C12.2 C30.2 C32.2 C34.1 C36.1 PS2.6 Q6.3 Q7.3 Q8.3 Q9.3 Q10.3 U2.1 U2.3 | length 20776
  Top Layer w10: v1(1583,2190.16) 1583,2004 1797.6,1789.4 C6.2 v1(3840.4,1789.4) C7.2 v1(5384.4,1789.4) C8.2 ; v1(3786.59,1267) 3786.59,1220 3799.59,1207 3814,1207 ; U2.3 3810,1107 3800,1117 3800,1193 3814,1207 ; U2.1 3814,1207 ; C34.1 4608.9,1114.1 4723,1000 4851,1000 v1(4965,1114) v1@4965.1,1114.1 ; v1(4965.1,1065) v1@4965.1,1114.1 ; C30.2 v1@4965.1,1114.1 ; C36.1 5985.44,1250 5996.88,1261.44 6194.56,1261.44 6208.56,1247.44 C32.2 6208.56,1148.44 v1(6259,1098) 6299,1058 6374,1058 6436,1120 6436,1180 6420,1196 6376.56,1196 C12.2 6376.56,1261.06 6400,1284.5 6525,1284.5 6549.5,1260 6549.5,1230 6596,1230 6726.41,1360.41 6805.59,1360.41 6826.5,1339.5 6826.5,1177.09 v1(6837,1166.59) ; v1(6891,1789) 6891.4,1789.4 C9.2 6956,1789.4 6956.6,1790 8443.4,1790 8444,1789.4 C10.2 8494.13,1789.4 8498.95,1794.22 8498.95,1829.95 v1(8542,1873)
  Layer 1 w10: v1(1583,2190.16) Q6.3 2000.16,2190 3435,2190 3435.16,2190.16 Q7.3 ; Q8.3 Q9.3 Q10.3
  Layer 2 w10: v1(3786.59,1267) 3786.59,1735.59 v1(3840.4,1789.4) ; v1(4965,1114) 4965,1370 v1(5384.4,1789.4) ; v1(6837,1166.59) 6891,1220.59 v1(6891,1789) ; v1(8542,1873) 8542,716 8600,658 9462,658 PS2.6
  Bottom Layer w10: Q7.3 3619.84,2190.16 3620,2190 4999.84,2190 Q8.3 ; v1(4965.1,1065) 5098.1,1198 5400,1198 5441,1157 5441,1037 5443,1035 6196,1035 v1(6259,1098)
NetC1_1: C1.1 D1.2 Q1.4 R1.2 R6.2 | length 1620.9
  Top Layer w10: R1.2 2100,3917.91 ; Q1.4 2000,3817.91 2100,3917.91 ; C1.1 2494,3754.6 D1.2@2494,4050 ; D1.2 D1.2@2494,4050 ; 2100,3917.91 R6.2 2324.91,3917.91 2457,4050 D1.2@2494,4050
NetC2_1: C2.1 D2.2 Q2.4 R2.2 R7.2 | length 1677.2
  Top Layer w10: R2.2 R7.2 3700.09,3917.91 ; Q2.4 3718,3627.84 3718,3900 3700.09,3917.91 ; C2.1 3994,3754.6 D2.2@3994,4050 ; D2.2 D2.2@3994,4050 ; 3700.09,3917.91 3847.91,3917.91 3980,4050 D2.2@3994,4050
NetC3_1: C3.1 D3.2 Q3.4 R3.2 R8.2 | length 1620.9
  Top Layer w10: R3.2 5100,3917.91 ; Q3.4 5000,3817.91 5100,3917.91 ; C3.1 5494,3754.6 D3.2@5494,4050 ; D3.2 D3.2@5494,4050 ; 5100,3917.91 R8.2 5324.91,3917.91 5457,4050 D3.2@5494,4050
NetC4_1: C4.1 D4.2 Q4.4 R4.2 R9.2 | length 1638.5
  Top Layer w10: R4.2 6600,3917.91 ; Q4.4 6566,3475.84 6566,3883.91 6600,3917.91 ; C4.1 6980,3710.6 6994,3724.6 D4.2@6994,4050 ; D4.2 D4.2@6994,4050 ; 6600,3917.91 R9.2 6823.91,3917.91 6956,4050 D4.2@6994,4050
NetC5_1: C5.1 D5.2 Q5.4 R5.2 R10.2 | length 1590.6
  Top Layer w10: R5.2 8109.91,3917.91 ; Q5.4 8000,3808 8109.91,3917.91 ; C5.1 8420,3710.6 8212.69,3917.91 ; D5.2 8480,4050 8347.91,3917.91 8212.69,3917.91 ; 8109.91,3917.91 R10.2 8212.69,3917.91
NetC6_1: C6.1 D6.2 Q6.4 R11.2 R16.2 | length 2175.2
  Top Layer w10: C6.1 2303.31,1710.6 2296,1717.91 R16.2 R11.2 1850,1693 1804,1647 1804,1443 1824,1423 2279,1423 2296,1406 2495.06,1406 2509.06,1420 D6.2
  Bottom Layer w15: v3(1850,1718) 1850,2090 Q6.4@2000,2090
NetC7_1: C7.1 D7.2 Q7.4 R12.2 R17.2 | length 1448
  Top Layer w10: R12.2 3350.33,1717.91 R17.2 3796,1717.91 3803.31,1710.6 C7.1 3980,1710.6 4009,1681.6 4009,1450 D7.2
  Top Layer w15: R12.2@3350.02,1717.99 3350.33,1717.91 v3(3420,1700)
  Bottom Layer w15: v3(3420,1700) 3420,2090 Q7.4@3500,2090
NetC8_1: C8.1 D8.2 Q8.4 R13.2 R18.2 | length 1947.5
  Top Layer w10: R13.2 5040,1717.91 ; C8.1 5303.31,1710.6 5296,1717.91 R18.2 5040,1717.91 ; D8.2 5499.21,1450 5470.84,1421.63 5454.93,1421.63 5437.3,1404 5080,1404 4987,1497 4987,1664.91 5040,1717.91
  Bottom Layer w15: v3(4850,1718) 4850,2090 Q8.4@5000,2090
NetC9_1: C9.1 D9.2 Q9.4 R14.2 R19.2 | length 1416
  Top Layer w10: R14.2 R19.2 6796,1717.91 6803.31,1710.6 C9.1 6999,1661.6 6999,1450 D9.2
  Bottom Layer w15: v3(6350,1718) 6350,2090 Q9.4@6500,2090
NetC10_1: C10.1 D10.2 Q10.4 R15.2 R20.2 | length 1410.1
  Top Layer w10: R15.2 R20.2 8296,1717.91 8303.31,1710.6 C10.1 8450,1509.06 D10.2
  Bottom Layer w15: v3(7850,1718) 7850,2090 Q10.4@8000,2090
OUTH_H: R1.1 R2.1 R3.1 R4.1 R5.1 U1.4 | length 8583.2
  Top Layer w10: R1.1 1850,3641 v1(1871,3620) ; v1(3225.09,3782.09) R2.1 v1(3423.91,3782.09) ; R3.1 v1(4909,3782.09) ; R4.1 v1(6480.09,3782.09) ; R5.1 v1(7850,3850) ; U1.4 v1(9673,4107)
  Layer 1 w10: v1(1871,3620) 3063,3620 v1(3225.09,3782.09) ; v1(3423.91,3782.09) v1(4909,3782.09) v1(6480.09,3782.09) 6809.09,3782.09 6877,3850 v1(7850,3850)
  Bottom Layer w10: v1(7850,3850) 7925.36,3925.36 9389.89,3925.36 9415.26,3900 9573,3900 9633,3960 9633,4067 v1(9673,4107)
OUTH_L: R11.1 R12.1 R13.1 R14.1 R15.1 U2.4 | length 7686.2
  Top Layer w10: R11.1 1979.09,1582.09 2019,1622 2729.09,1622 2769,1582.09 3304,1582.09 ; R12.1 3304,1582.09 ; U2.4 4054,1057 4117,1120 4117,1348 4351.09,1582.09 ; R15.1 7375.09,1582.09 7181,1388 6838.41,1388 6826,1400.41 6382.59,1400.41 6350,1433 R14.1 5789.09,1582.09 5587,1380 5521.29,1380 5506.29,1395 5456.59,1395 5441.59,1380 4910,1380 4850,1440 R13.1 4351.09,1582.09 ; 3304,1582.09 3304,1758 3789,1758 3798,1749 4041,1749 4207.91,1582.09 4351.09,1582.09
OUTL_H: R6.1 R7.1 R8.1 R9.1 R10.1 U1.6 | length 9351.6
  Top Layer w10: R6.1 2150,3636 2264,3522 3493,3522 3650,3679 R7.1 3599.09,3782.09 v1(3350,3533) ; v1(5150,3680) R8.1 v1(5150,3850) ; R9.1 v1(6650,3850) ; R10.1 8150,3756 8160,3746 v1(8230,3746) v1(8300,3746) ; U1.6 v1(9673,4007)
  Layer 1 w10: v1(5150,3850) v1(6650,3850) ; v1@6650,3844 6728,3922 8054,3922 v1(8230,3746)
  Bottom Layer w10: v1(3350,3533) 5003,3533 v1(5150,3680) ; v1(8300,3746) 8459.36,3905.36 9369.89,3905.36 9397.26,3878 9631,3878 9673,3920 v1(9673,4007)
OUTL_L: R16.1 R17.1 R18.1 R19.1 R20.1 U2.6 | length 7455.1
  Top Layer w10: R16.1 2585.91,1582.09 2673,1495 3600,1495 3650,1545 R17.1 3889.91,1582.09 v1(3923,1549) 3952,1520 v1(3952,1310) ; U2.6 v1(3923,957) ; v1(5027,1647) 5123,1647 5150,1620 R18.1 5730,1582.09 5769.91,1622 6480,1622 6519.91,1582.09 R19.1 6650,1497 6726.59,1420.41 6846,1420.41 6856.41,1410 7103,1410 7337,1644 7877.09,1644 7939,1582.09 R20.1
  Layer 2 w10: v1(3923,957) v1(3923,1549)
  Bottom Layer w10: v1(3952,1310) 4690,1310 v1(5027,1647)
PH: D12.1 J5.1 J5.2 J5.3 J5.4 J5.5 J5.6 J5.7 J5.8 J5.9 J5.10 J5.11 J5.12 J5.13 J5.14 J5.15 J5.16 J5.17 J5.18 J5.19 J5.20 J5.22 J6.1 J6.2 J6.3 J6.4 J6.5 J6.6 J6.7 J6.8 J6.9 J6.10 J6.11 J6.12 J6.13 J6.14 J6.15 J6.16 J6.17 J6.18 J6.19 J6.20 J6.22 Q1.2 Q2.2 Q3.2 Q4.2 Q5.2 Q6.1 Q7.1 Q8.1 Q9.1 Q10.1 | length 541.4
  Top Layer w10: J5.8 9350,2750 J5.22
  Layer 1 w10: J6.4 10250,2950 J6.22
PWM_H: J7.5 U1.10 | length 12430.5
  Top Layer w10: v1(9909,3957) U1.10
  Layer 2 w10: v1(9500,1707) 9500,2427 9909,2836 v1(9909,3957)
  Bottom Layer w10: J7.5 877.44,227.56 878,227 3603,227 4199,823 4199,940 4178,961 4057,961 3961,1057 3961,1180 3999,1218 4736,1218 5028,1510 6859.35,1510 6875.35,1494 9287,1494 v1(9500,1707)
PWM_L: J7.6 U2.10 | length 3910.9
  Top Layer w10: v1(4159,907) U2.10
  Bottom Layer w10: J7.6 681.89,866.89 856,1041 1583,1041 1659,965 2824,965 2834,975 2989,975 3092,872 3537,872 3613,948 3855,948 3896,907 v1(4159,907)
RST_N: J7.8 U1.14 U2.14 | length 12658.8
  Top Layer w10: v1(4159,1107) U2.14 ; v1(9909,4157) U1.14
  Layer 1 w10: J7.8 740.11,522 1145,522 1805,1182 2134,1182 2261,1055 2718,1055 2734,1071 2870,1071 2887.4,1053.6 4105.6,1053.6 v1(4159,1107)
  Layer 2 w10: v1(8880,1369) 8880,1659 8971,1750 8971,4160 9030,4219 9553,4219 9625,4147 9899,4147 v1(9909,4157)
  Bottom Layer w10: v1(4159,1107) 4302,1107 4357,1162 4880.29,1162 5087.29,1369 5458.87,1369 5464.87,1375 5498.01,1375 5504.01,1369 v1(8880,1369)
VDD_H: C29.1 C31.1 PS1.7 U1.5 | length 8174.9
  Top Layer w10: 9451.1,4082.4 9451,4082.4 9451,4056.8 9527,4056.8 9527.2,4057 U1.5 9690,4057 9713,4034 9713,3980 9675,3942 9675,3860 9575.44,3760.44 C31.1 9575.44,3600 9575.44,3560 9581.44,3554 ; C29.1 10596.9,3976.4 10588.5,3968 10588.5,3608.5 10448,3468 9667.44,3468 9581.44,3554 ; PS1.7 10950,2010 10965,2025 10965,3509 10920,3554 10080,3554 10040,3594 ; 9581.44,3554 10000,3554 10040,3594 ; 10040,3594 10040,3797 10120.9,3877.9 ; 10120.9,3877.9 10121,3878 10121,4225.1 10110,4236.1 10120.9,4247 10120.9,3877.9
VDD_L: C30.1 C32.1 PS2.7 U2.5 | length 8061.7
  Top Layer w10: 3701.1,1032.4 3701,1032.4 3701,1006.8 3777,1006.8 3777.2,1007 U2.5 3960,1007 4160,807 4320,807 4370.9,857.9 4370.9,1135.1 v1(4392,1114) ; v1(4827.05,1114) 4846.9,1133.85 C30.1 ; v1(6153.44,1136) C32.1 ; v1(7080,775) 7080,1143.5 7166.5,1230 v1(7166.5,1099)
  Layer 1 w10: v1(4392,1114) v1(4827.05,1114) 4867.05,1154 5116,1154 ; 5817.44,1103.22 5755.22,1041 ; v1(5851,1136) 5756,1041 5755.22,1041 ; 5116,1154 5173,1154 5286,1041 ; 5116,1154 5229,1041 5286,1041 ; 5286,1041 5755.22,1041
  Layer 2 w10: v1(5851,1136) v1(6153.44,1136) 6260.44,1243 6444,1243 6588,1099 v1(7166.5,1099)
  Bottom Layer w10: v1(7080,775) 7197,658 9191,658 9355,494 9726,494 PS2.7
VEE_H: C33.2 C35.2 PS1.5 U1.8 | length 9807.3
  Top Layer w10: 9414.06,4108 9410,4108 9400,4098 9400,4041.2 9410,4031.2 9410,4005.6 9377.85,4005.6 9352.25,3980 9451,3980 ; 9451.1,3980 9451,3980 ; 9451.1,4235.9 9451,4235.9 ; 9451.1,4261.5 9451,4261.5 9451,4235.9 ; v1@9513,3645 9477.56,3645 9462.56,3660 9462.56,3670 ; v1(9513,3654) 9478.56,3654 9462.56,3670 ; U1.8 9529.7,3907 9526,3903.3 9451,3903.3 ; v1(10141.5,3833) 10141.5,3670 10151.5,3660 10337,3660 10352,3675 10352,3939.5 10400,3987.5 10447,3987.5 10481.5,3953 10481.5,3970 ; C33.2 10477.1,4160 10477.1,3974.4 10481.5,3970 ; v1(10553,4046) 10481.5,3974.5 10481.5,3970 ; PS1.5 10750,381 10760,371 10970,371 10999,400 10999,3996 v1(10959,4036) ; 11286.56,4275 11286.56,4271 11321,4271 v1(11337,4255) ; 9451,3903.3 9451,3877.7 9451.1,3877.7 9451.1,3852.1 ; 9451,3903.3 9451,3928.8 9452,3928.8 9452,3954.4 9451,3954.4 9451,3980 ; 9451,4235.9 9326.9,4235.9 9280,4189 9280,4129 9296,4113 9296,4031 9290,4025 9290,3840 9312,3818 9371.9,3818 9406,3852.1 9451.1,3852.1 ; 9451.1,3852.1 9451.1,3826.5 9462.56,3826.5 C35.2 9462.56,3670
  Layer 1 w10: v1(10553,4046) 10949,4046 v1(10959,4036)
  Bottom Layer w10: v1(9513,3654) 9692,3833 ; v1(10141.5,3833) 9692,3833 ; v1(11337,4255) 10114,4255 9692,3833
VEE_L: C34.2 C36.2 PS2.5 U2.8 | length 9086.3
  Top Layer w10: 3701.1,827.7 3701,827.7 3701,853.3 ; 3701.1,930 3701,930 ; 3701.1,1185.9 3701,1185.9 3701,1211.5 3740,1211.5 3765,1186.5 3778,1186.5 3778,1083.6 3745,1083.6 ; 3740,1083.6 3664.06,1083.6 3664.06,1058 3640,1038 3640,1001.2 3660,981.2 3660,955.6 3627.85,955.6 3602.25,930 3701,930 ; v1(4727.1,1074) C34.2 4727.1,1280 4681.1,1326 4535.1,1326 4489.1,1280 4489.1,820.1 4455,786 4090,786 4019,857 U2.8 3779.7,857 3776,853.3 3701,853.3 ; v1(5580,1307) 5580,1273 5680,1273 5704.56,1248.44 5704.56,1225 5708.78,1195.78 v1(5766.34,1195.78) ; 5872.56,1225 5872.56,1221 ; v1(5923,1221) 5872.56,1221 ; C36.2 6040.56,1191.56 6000,1151 5898.56,1151 5872.56,1177 5872.56,1221 ; v1(6766,1320.41) 6766,1302.88 6719.5,1256.38 6719.5,1094.5 6760,1054 7000,1054 7060,1114 7060,1230 7059.5,1230 7010,1180.5 v1(7010,775) ; 3701,853.3 3701,878.8 3702,878.8 3702,904.4 3701,904.4 3701,930
  Layer 1 w10: v1(5766.34,1195.78) 5897.78,1195.78 v1(5923,1221) 6022.41,1320.41 v1(6766,1320.41) ; v1(7010,775) 7142,643 9191,643 9414,420 PS2.5
  Bottom Layer w10: v1(4727.1,1074) 4731.1,1070 4841,1070 4925,1154 5018,1154 5107,1243 5516,1243 v1(5580,1307)
pads on no net: D13.2 D14.2 J7.4 J7.9 J7.10 J7.11 J7.12 U1.12 U1.16 U2.12 U2.16

## Polygon pours and split planes (outlines as drawn)
DCP on Layer 1 "DCP_MID1" (solid, remove dead copper, pour order 4): 8900,4380 10400,4380 10400,6640 8900,6640
DCP on Layer 1 "DCP_MID1" (solid, remove dead copper, pour order 0): 150,1990 8950,1990 8950,6640 150,6640
DCN on Layer 2 "DCN_MID2" (solid, remove dead copper, pour order 5): 8900,4380 10400,4380 10400,6640 8900,6640
DCN on Layer 2 "DCN_MID2" (solid, remove dead copper, pour order 1): 150,1990 8950,1990 8950,6640 150,6640
PH on Bottom Layer "PH_BOT" (solid, remove dead copper, pour order 7): 1700,2420 10950,2420 10950,3400 1700,3400
PH on Top Layer "PH_TOP" (solid, remove dead copper, pour order 6): 1700,2420 10950,2420 10950,3400 1700,3400